# Altium PCB STM32_DevBoard.PcbDoc (part 2 of 2)
Units mm, origin at the board's own origin, x right, y up, seen from the top; angles counter-clockwise.
Board outline 80.64 x 69.55 mm, 2 copper layers (Top Layer, Bottom Layer); 79 components, 67 nets, 279 pads, 244 vias.
Unrouted connection lines stored in the file: 67.
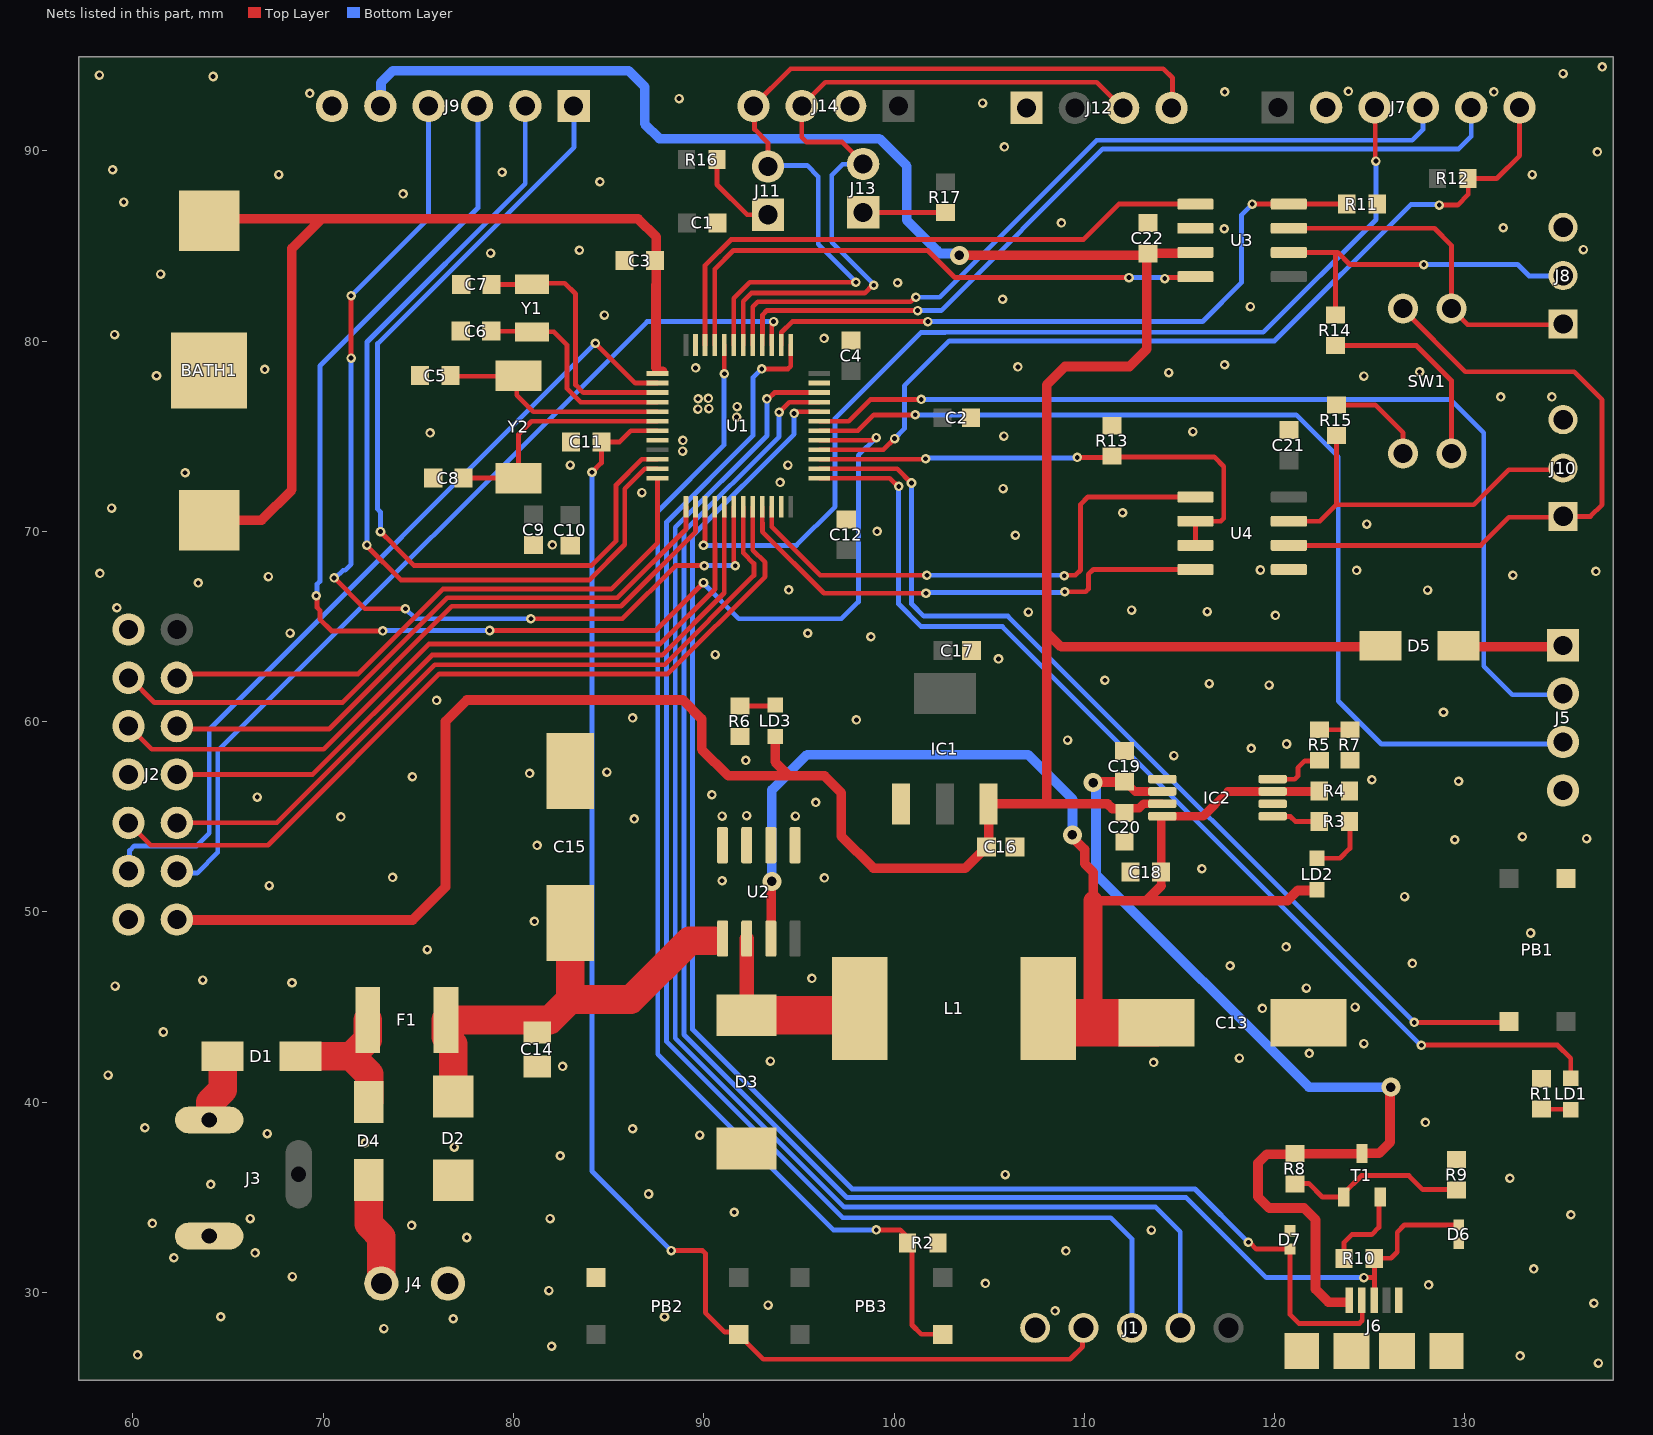
[diagram p2: the nets of this part, all layers, seen from the top]

## Via types
v1: diameter 0.5, hole 0.256, Top Layer to Bottom Layer, tented both sides, 179 vias
v2: diameter 0.5, hole 0.25, Top Layer to Bottom Layer, tented both sides, 51 vias
v3: diameter 1, hole 0.5, Top Layer to Bottom Layer, tented both sides, 14 vias

## Nets (pads, with @x,y where several pads share a name; then routed paths per layer and width w, separated by ;. In a path a pad name is that pad's centre, name@x,y a point inside that pad or via, vN(x,y) a via of type N, cw(c..) or ccw(c..) an arc to the next point about the centre after c; other vN are vias at no path point) (continued)
+5V: C16.2 C20.2 C22.2 D5.1 IC1.3 IC2.OUT J2.13 J9.5 LD3.2 U3.VCC | length 175.2
  Top Layer w0.45: C20.2@112.116,55.208 112.366,55.458 112.887,55.458 113.111,55.682 IC2.OUT@114.092,55.682
  Top Layer w0.508: J2.13@62.306,49.606 62.332,49.581 74.701,49.581 76.429,51.308 76.429,60.02 77.546,61.138 88.9,61.138 89.891,60.147 89.891,58.547 91.288,57.15 94.488,57.15 ; LD3.2@93.751,59.221 93.751,57.887 94.488,57.15 ; v3(103.429,84.506) 113.246,84.506 C22.2@113.335,84.595 ; C20.2@112.116,55.208 111.895,55.429 111.475,55.429 111.221,55.682 108.015,55.682 ; U3.VCC@115.833,84.658 115.168,84.658 115.117,84.607 113.424,84.607 113.284,84.468 113.284,79.578 112.37,78.664 108.98,78.664 108.015,77.699 108.015,64.694 ; D5.1@125.56,63.983 125.509,63.932 108.777,63.932 108.015,64.694 ; 94.488,57.15 96.342,57.15 97.231,56.261 97.231,53.975 98.908,52.299 103.746,52.299 C16.2@104.863,53.416 104.976,53.529 104.976,55.682 108.015,55.682 ; 108.015,55.682 108.015,64.694
  Bottom Layer w0.508: J9.5@73,92.354 73.035,92.389 73.035,93.583 73.66,94.209 86.055,94.209 86.893,93.37 86.893,91.415 87.668,90.64 99.225,90.64 100.673,89.192 100.673,86.347 102.261,84.759 102.42,84.6 103.335,84.6 v3(103.429,84.506)
BOOT0: PB3.1 R2.1 U1.44 | length 62.4
  Top Layer w0.254: U1.44@91.071,79.79 91.071,78.296 v2(91.084,78.283) ; v2(99.06,33.294) 100.325,33.294 100.94,32.68 100.94,28.296 101.424,27.812 PB3.1@102.556,27.812
  Bottom Layer w0.254: v2@91.059,78.283 91.059,74.524 87.579,71.044 87.579,42.52 96.805,33.294 v2(99.06,33.294)
BUCK_5V: C13.1 C18.1 IC2.D1 IC2.IN1 L1.2 LD2.2 R4.2 U2.3 | length 69.2
  Top Layer w0.45: C18.1@114.033,52.502 114.033,55.032 IC2.IN1@114.092,55.032 116.246,55.032 117.546,56.332 IC2.D1@119.892,56.332 122.309,56.332 R4.2@122.339,56.363 ; 114.046,51.384 C18.1@114.046,52.489
  Top Layer w0.508: U2.3@93.523,48.599 93.548,48.624 93.548,51.587 v3(93.574,51.613) ; v3(109.372,54.051) 109.372,53.918 110.012,53.279 110.012,52.547 110.465,52.094 110.465,50.597 113.258,50.597 ; 114.046,51.384 113.258,50.597 ; LD2.2@122.225,51.169 122.186,51.13 121.209,51.13 120.675,50.597 113.258,50.597
  Top Layer w1: 110.465,44.171 110.465,50.597
  Top Layer w2.5: L1.2@108.099,44.933 108.861,44.171 110.465,44.171 C13.1@113.78,44.171
  Bottom Layer w0.508: v3(93.574,51.613) 93.574,56.413 95.428,58.268 107.036,58.268 109.372,55.931 v3(109.372,54.051)
CAN_RX: U1.45 U3.RXD | length 30.3
  Top Layer w0.254: U1.45@90.571,79.79 90.571,83.782 91.549,84.76 101.778,84.76 103.2,83.337 v2(112.344,83.337) ; v2(114.224,83.287) 114.271,83.334 115.778,83.334 U3.RXD@115.833,83.388
  Bottom Layer w0.254: v2(112.344,83.337) v2@114.198,83.337
CAN_S: R11.1 U1.38 U3.S | length 35.3
  Top Layer w0.254: U1.38@94.071,79.79 94.071,80.451 94.646,81.026 v2(101.778,81.026) ; v2(118.821,87.198) U3.S@120.743,87.198 R11.1@123.787,87.198
  Bottom Layer w0.254: v2(101.778,81.026) 116.205,81.026 118.264,83.085 118.264,83.488 118.262,83.49 118.262,86.639 v2(118.821,87.198)
CAN_TX: U1.46 U3.TXD | length 31.3
  Top Layer w0.254: U1.46@90.071,79.79 90.071,83.975 91.429,85.333 109.945,85.333 111.811,87.198 U3.TXD@115.833,87.198
CANH: J8.1 SW1.1A U3.CANH | length 18.5
  Top Layer w0.254: U3.CANH@120.743,85.928 128.397,85.928 129.286,85.039 SW1.1A@129.286,81.712 130.137,80.861 135.115,80.861 J8.1@135.153,80.899
CANL: J8.2 R14.2 U3.CANL | length 18.2
  Top Layer w0.254: U3.CANL@120.743,84.658 123.19,84.658 ; R14.2@123.19,81.369 123.19,84.658 ; v2(127.838,84.023) 123.952,84.023 123.317,84.658 123.19,84.658
  Bottom Layer w0.254: v2(127.838,84.023) 132.766,84.023 133.363,83.426 135.141,83.426 J8.2@135.153,83.439
CS: J7.6 R12.2 U1.28 | length 47.6
  Top Layer w0.254: U1.28@96.071,74.29 99.436,74.29 v2(100.025,74.879) ; v2(128.651,87.147) 129.616,87.147 130.175,87.706 130.175,88.532 R12.2@130.162,88.544 131.674,88.544 132.867,89.738 J7.6@132.867,92.278
  Bottom Layer w0.254: v2(100.025,74.879) 100.54,75.394 100.54,77.655 102.895,80.01 119.99,80.01 127.152,87.173 128.626,87.173 v2(128.651,87.147)
CTRL1: J9.1 U1.10 | length 46.1
  Top Layer w0.254: v2(73.011,69.991) 73.696,69.305 73.696,69.28 74.778,68.199 84.092,68.199 85.391,69.498 85.391,72.437 86.744,73.79 U1.10@87.571,73.79
  Bottom Layer w0.254: v2(73.011,69.991) 73.011,71.014 72.858,71.167 72.858,79.869 83.185,90.195 83.185,92.329 J9.1@83.16,92.354
CTRL2: J9.2 U1.11 | length 46.7
  Top Layer w0.254: v2(72.299,69.28) 72.299,69.229 74.092,67.437 83.972,67.437 85.845,69.31 85.845,72.231 86.904,73.29 U1.11@87.571,73.29
  Bottom Layer w0.254: v2(72.299,69.28) 72.299,79.952 80.62,88.272 J9.2@80.62,92.354
CTRL3: J9.3 U1.29 | length 73.5
  Top Layer w0.254: v2(69.632,66.613) 69.68,66.566 69.68,66 69.825,65.855 69.825,65.38 70.434,64.77 v2(73.127,64.77) ; v2(78.74,64.791) 87.466,64.791 v2(89.984,67.31) ; U1.29@96.071,74.79 98.853,74.79 98.993,74.93 v2(99.06,74.93)
  Bottom Layer w0.254: v2(69.632,66.613) 69.68,66.66 69.68,67.226 69.825,67.371 69.825,78.689 78.13,86.995 78.13,92.304 J9.3@78.08,92.354 ; v2(73.127,64.77) 73.148,64.791 v2(78.74,64.791) ; v2(89.984,67.31) 89.984,67.267 91.846,65.405 97.231,65.405 98.122,66.296 98.122,73.992 v2(99.06,74.93)
CTRL4: J9.4 U1.18 | length 53.2
  Top Layer w0.254: v2(70.572,67.553) 72.187,65.938 v2(74.32,65.938) ; v2(71.463,79.108) v2(71.463,82.385) ; v2(80.914,65.405) 85.725,65.405 88.519,68.199 v2(90.018,68.199) ; U1.18@91.571,71.29 91.571,68.45 91.601,68.42 91.601,68.246 v2(91.648,68.199)
  Bottom Layer w0.254: v2(70.572,67.553) 70.639,67.553 71.045,67.959 71.153,67.959 71.463,68.27 71.463,79.032 v2@71.425,79.07 ; v2(71.463,82.385) 75.54,86.462 J9.4@75.54,92.354 ; v2(74.32,65.938) 74.854,65.405 v2(80.914,65.405) ; v2(90.018,68.199) v2(91.648,68.199)
GND: BATH1.2 C1.2 C2.1 C3.1 C4.2 C5.1 C6.1 C7.1 C8.1 C9.1 C10.1 C11.2 C12.2 C13.2 C14.1 C15.2 C16.1 C17.1 C18.2 C19.1 C20.1 C21.2 C22.1 D2.2 D3.2 D6.1 D7.1 IC1.1 IC2.D0 IC2.GND J1.5 J2.2 J2.8 J2.14 J3.2 J4.2 J5.4 J6.5 J6.S3 J6.S4 J6.S5 J6.S6 J7.2 J8.3 J9.6 J10.3 J12.1 J14.2 PB1.4 PB2.4 R1.1 R2.2 R4.1 R6.1 R7.1 R9.1 R11.2 R13.1 U1.8 U1.23 U1.35 U1.47 U2.5 U2.6 U2.7 U2.8 U3.GND U4.GND | length 0.1
  Top Layer w0.254: C11.2@82.982,74.663 C11.2@83.02,74.701
  other v1: 137.008,26.289 132.893,26.67 60.249,26.721 82.002,27.178 73.187,28.101 76.835,28.626 64.618,28.727 87.935,28.727 108.458,29.032 93.379,29.342 136.779,29.439 81.864,30.099 128.092,30.404 104.8,30.482 68.377,30.836 133.612,31.247 62.154,31.826 66.421,32.08 109.025,32.186 77.546,32.893 113.521,33.279 74.64,33.525 61.025,33.633 66.167,33.884 81.923,33.888 135.568,34.091 91.601,34.218 87.097,35.179 64.089,35.681 132.358,36.006 105.842,36.195 82.457,37.19 76.886,37.643 72.212,37.871 89.789,38.278 67.062,38.351 86.258,38.608 60.63,38.659 127.923,38.943 58.699,41.427 82.575,41.885 113.638,42.099 93.497,42.164 118.144,42.321 121.818,42.57 124.689,43.078 61.603,43.693 119.355,44.933 124.225,45 121.666,45.999 59.063,46.106 68.36,46.283 63.669,46.422 95.682,46.507 117.661,47.172 127.242,47.297 75.464,48.02 120.598,48.161 133.452,48.895 81.102,49.505 126.831,50.805 67.166,51.389 90.957,51.638 96.342,51.791 73.643,51.821 116.18,52.273 81.238,53.497 129.464,53.797 136.39,53.856 133.02,53.95 86.343,54.894 70.925,54.996 90.957,55.042 94.818,55.042 92.253,55.067 95.885,55.753 66.531,56.037 90.424,56.159 129.667,56.871 125.106,56.947 74.684,57.104 80.848,57.277 84.912,57.353 92.202,57.963 114.706,58.217 118.77,58.598 120.625,58.826 109.118,59.03 98.019,60.096 86.258,60.198 128.871,60.498 75.954,61.117 119.71,61.925 116.561,62.001 111.074,62.179 105.486,63.297 90.602,63.525 98.781,64.465 95.462,64.648 68.263,64.659 120.04,65.583 107.061,65.761 116.459,65.786 112.48,65.867 59.157,65.989 128.034,66.913 94.463,66.929 63.432,67.289 67.115,67.619 132.52,67.696 58.268,67.793 136.881,67.894 124.307,67.945 119.253,67.97 82.042,69.291 106.375,69.799 99.111,70.002 124.841,70.383 112.01,70.977 58.877,71.222 86.749,72.039 105.733,72.248 94.014,72.572 62.746,73.08 82.982,73.482 94.419,73.485 88.883,74.223 88.9,74.778 105.774,75.011 75.613,75.173 115.705,75.239 91.728,76.001 89.687,76.429 90.272,76.454 91.753,76.56 89.696,76.967 90.246,76.987 131.88,77.07 134.569,77.064 124.689,78.156 61.239,78.181 114.436,78.348 127.618,78.389 66.929,78.511 89.569,78.592 106.511,78.643 117.363,78.756 96.325,80.142 59.038,80.345 84.773,81.364 118.72,81.813 105.698,82.199 100.186,83.063 61.451,83.52 78.8,84.62 83.467,84.771 136.22,84.811 117.348,85.903 132.012,85.958 108.788,86.208 59.521,87.304 74.202,87.736 84.54,88.371 67.666,88.748 133.536,88.752 79.4,88.875 58.928,89.002 136.957,89.941 105.799,90.2 104.648,92.507 88.705,92.74 69.291,93.015 117.373,93.091 131.521,93.091 123.876,93.116 64.211,93.904 58.242,93.98 135.153,94.056 137.211,94.412
I2C_SCL: J12.3 J13.2 J14.3 U1.42 | length 41.5
  Top Layer w0.254: U1.42@92.071,79.79 92.071,82.089 92.5,82.518 98.454,82.518 98.866,82.931 v2(98.933,82.931) ; J13.2@98.374,89.306 98.374,89.351 97.265,90.46 95.402,90.46 95.148,90.714 J14.3@95.148,92.354 96.393,93.599 110.642,93.599 111.989,92.253 J12.3@112.039,92.253
  Bottom Layer w0.254: J13.2@98.374,89.306 98.359,89.291 97.292,89.291 96.723,88.722 96.723,85.199 98.933,82.989 v2(98.933,82.931)
I2C_SDA: J11.2 J12.4 J14.4 U1.43 | length 46.6
  Top Layer w0.254: U1.43@91.571,79.79 91.571,82.249 92.417,83.095 v2(97.993,83.095) ; J11.2@93.37,89.179 93.37,90.424 92.671,91.123 92.671,92.292 J14.4@92.608,92.354 94.564,94.31 114.148,94.31 114.63,93.828 114.63,92.304 J12.4@114.579,92.253
  Bottom Layer w0.254: J11.2@93.37,89.179 93.421,89.23 95.428,89.23 96.012,88.646 96.012,85.088 97.993,83.107 v2(97.993,83.095)
MISO: J7.5 U1.40 | length 44.2
  Top Layer w0.254: U1.40@93.071,79.79 93.071,80.334 93.087,80.35 93.087,81.378 93.32,81.61 101.226,81.61 v2(101.233,81.603)
  Bottom Layer w0.254: v2(101.233,81.603) 102.481,81.603 110.975,90.097 129.67,90.097 130.327,90.754 J7.5@130.327,92.278
MOSI: J7.4 U1.41 | length 42.3
  Top Layer w0.254: U1.41@92.571,79.79 92.571,81.801 92.834,82.064 100.874,82.064 101.116,82.306 v2(101.146,82.306)
  Bottom Layer w0.254: v2(101.146,82.306) 102.399,82.306 110.644,90.551 127.229,90.551 127.787,91.11 J7.4@127.787,92.278
NetC5_2: C5.2 U1.5 Y2.2 | length 12.4
  Top Layer w0.254: C5.2@76.695,78.181 76.721,78.155 80.231,78.155 Y2.2@80.264,78.189 80.171,78.096 80.171,77.157 81.038,76.29 U1.5@87.571,76.29
NetC8_2: C8.2 U1.6 Y2.1 | length 12.8
  Top Layer w0.254: C8.2@77.381,72.796 80.256,72.796 Y2.1@80.264,72.789 80.264,75.108 80.946,75.79 U1.6@87.571,75.79
NetD1_2: D1.2 J3.1 | length 3.4
  Top Layer w1.5: J3.1@64.058,39.294 64.058,40.004 64.719,40.665 64.719,42.4 D1.2@64.701,42.418
NetD3_1: D3.1 L1.1 U2.2 | length 10.1
  Top Layer w0.75: D3.1@92.253,44.572 U2.2@92.253,48.599 ; L1.1@97.839,44.572 L1.1@98.199,44.933
  Top Layer w2: D3.1@92.253,44.572 L1.1@97.839,44.572
NetD4_2: D4.2 J4.1 | length 5.7
  Top Layer w1.5: D4.2@72.39,35.923 72.39,33.604 73.053,32.941 J4.1@73.053,30.48
NetD5_2: D5.2 J5.1 | length 5.5
  Top Layer w0.254: J5.1@135.077,63.932 J5.1@135.153,64.008
  Top Layer w0.508: D5.2@129.66,63.983 129.71,63.932 J5.1@135.077,63.932
NetJ11_1: J11.1 R16.2 | length 4.6
  Top Layer w0.254: R16.2@90.691,89.535 90.691,88.227 92.278,86.639 J11.1@93.37,86.639
NetJ13_1: J13.1 R17.2 | length 4.3
  Top Layer w0.254: J13.1@98.374,86.766 98.387,86.754 R17.2@102.692,86.754
NetLD1_1: LD1.1 R1.2 | length 1.6
  Top Layer w0.254: R1.2@134.01,39.637 135.535,39.637 LD1.1@135.56,39.612
NetLD2_1: LD2.1 R3.1 | length 3.4
  Top Layer w0.254: LD2.1@122.225,52.819 123.431,52.819 123.952,53.34 R3.1@123.952,54.75
  Top Layer w0.508: R3.1@123.939,54.762 R3.1@123.952,54.75
NetLD3_1: LD3.1 R6.2 | length 1.9
  Top Layer w0.254: R6.2@91.897,60.82 93.701,60.82 LD3.1@93.751,60.871
NetR3_2: IC2.STAT R3.2 | length 2.6
  Top Layer w0.254: IC2.STAT@119.892,55.032 119.908,55.016 120.828,55.016 121.082,54.762 R3.2@122.339,54.762
NetR5_1: R5.1 R7.2 | length 1.6
  Top Layer w0.254: R5.1@122.352,59.576 R7.2@123.952,59.576
NetR5_2: IC2.ILIM R5.2 | length 3.1
  Top Layer w0.254: IC2.ILIM@119.892,56.982 119.902,56.972 121.056,56.972 121.221,57.137 121.221,57.569 121.59,57.937 122.314,57.937 R5.2@122.352,57.976
NetR8_1: R8.1 R9.2 T1.1 | length 9.7
  Top Layer w0.254: R8.1@121.056,35.7 121.094,35.738 121.793,35.738 122.511,35.02 T1.1@123.637,35.02 123.637,35.22 124.562,36.144 127.051,36.144 127.787,35.408 129.553,35.408 R9.2@129.565,35.395
NetR10_1: R10.1 T1.2 | length 4.6
  Top Layer w0.254: R10.1@123.635,31.801 123.635,32.626 124.054,33.045 125.095,33.045 125.476,33.426 125.476,34.959 T1.2@125.537,35.02
NetR14_1: R14.1 SW1.1B | length 10.7
  Top Layer w0.254: R14.1@123.19,79.769 127.444,79.769 129.286,77.927 SW1.1B@129.286,74.092
NetR15_1: R15.1 SW1.2B | length 5.2
  Top Layer w0.254: R15.1@123.241,76.644 125.286,76.644 126.746,75.184 SW1.2B@126.746,74.092
NRST: C11.1 J1.4 PB2.1 U1.7 | length 74.7
  Top Layer w0.254: v2(84.125,73.101) 84.62,73.596 C11.1@84.62,74.701 85.573,74.701 86.161,75.29 U1.7@87.571,75.29 ; v2(88.29,32.207) 89.932,32.207 90.081,32.058 90.081,28.943 91.105,27.919 91.704,27.919 93.131,26.492 109.245,26.492 109.906,27.153 109.906,28.092 J1.4@109.957,28.143
  Bottom Layer w0.254: v2(84.125,73.101) 84.125,36.373 v2(88.29,32.207)
PA2: J2.3 U1.12 | length 31.6
  Top Layer w0.254: J2.3@62.306,62.306 62.509,62.509 71.831,62.509 76.292,66.97 85.131,66.97 87.571,69.41 U1.12@87.571,72.79
PA3: J2.4 U1.13 | length 34.8
  Top Layer w0.254: J2.4@59.766,62.306 59.829,62.306 61.132,61.003 71.01,61.003 76.524,66.516 85.462,66.516 89.071,70.125 U1.13@89.071,71.29
PA4: J2.5 U1.14 | length 32.9
  Top Layer w0.254: J2.5@62.306,59.766 62.459,59.614 70.307,59.614 76.756,66.062 85.65,66.062 89.571,69.983 U1.14@89.571,71.29
PA6: J2.6 U1.16 | length 39.2
  Top Layer w0.254: J2.6@59.766,59.766 60.985,58.547 70.028,58.547 75.565,64.084 87.706,64.084 90.595,66.973 90.595,69.391 90.571,69.414 U1.16@90.571,71.29
PA7: J2.7 U1.17 | length 37.2
  Top Layer w0.254: J2.7@62.306,57.226 69.444,57.226 75.717,63.5 87.808,63.5 91.071,66.763 U1.17@91.071,71.29
PB1: J2.9 U1.19 | length 39.6
  Top Layer w0.254: J2.9@62.306,54.686 67.564,54.686 75.87,62.992 87.942,62.992 92.634,67.684 92.634,68.309 92.071,68.871 U1.19@92.071,71.29
PB2: J2.10 U1.20 | length 43.7
  Top Layer w0.254: J2.10@59.766,54.686 60.943,53.509 67.098,53.509 76.098,62.509 88.101,62.509 93.218,67.626 93.218,68.366 92.571,69.013 U1.20@92.571,71.29
PB3: J2.11 U1.39 | length 47.8
  Top Layer w0.254: U1.39@93.571,79.79 93.571,80.866 93.664,80.959 v2(93.664,81.026)
  Bottom Layer w0.254: J2.11@62.306,52.146 62.408,52.045 63.373,52.045 64.462,53.134 64.462,58.468 87.02,81.026 v2(93.664,81.026)
PC13: J2.12 U1.2 | length 44
  Top Layer w0.254: v2(84.303,79.883) 86.396,77.79 U1.2@87.571,77.79
  Bottom Layer w0.254: J2.12@59.766,52.146 59.824,52.204 59.824,53.228 60.071,53.475 63.348,53.475 64.008,54.136 64.008,59.588 v2(84.303,79.883)
RS485_A: J10.1 SW1.2A U4.A | length 35.3
  Top Layer w0.254: U4.A@120.743,69.266 130.835,69.266 132.309,70.739 135.103,70.739 J10.1@135.153,70.79 136.593,70.79 137.203,71.399 137.203,76.919 135.738,78.384 130.023,78.384 126.746,81.661 SW1.2A@126.746,81.712
RS485_B: J10.2 R15.2 U4.B | length 19.2
  Top Layer w0.254: U4.B@120.743,70.536 122.377,70.536 123.241,71.399 ; R15.2@123.241,75.044 123.241,71.399 ; J10.2@135.153,73.33 135.064,73.241 132.296,73.241 130.454,71.399 123.241,71.399
RS485_DE: R13.2 U1.27 U4.!RE U4.DE | length 27.1
  Top Layer w0.254: U1.27@96.071,73.79 101.628,73.79 v2(101.651,73.812) ; v2(109.626,73.889) 111.392,73.889 R13.2@111.455,73.952 111.493,73.914 116.815,73.914 117.319,73.41 117.319,70.685 117.17,70.536 U4.!RE@115.833,70.536 U4.DE@115.833,69.266
  Bottom Layer w0.254: v2(101.651,73.812) 101.689,73.85 109.588,73.85 v2(109.626,73.889)
RS485_UART_RX: U1.22 U4.R | length 28.1
  Top Layer w0.254: U1.22@93.571,71.29 93.571,70.234 96.114,67.691 v2(101.727,67.691) ; v2(108.942,67.667) 108.966,67.691 109.525,67.691 109.804,67.97 109.804,71.425 110.185,71.806 U4.R@115.833,71.806
  Bottom Layer w0.254: v2(101.727,67.691) v2@108.935,67.691
RS485_UART_TX: U1.21 U4.D | length 26.4
  Top Layer w0.254: U1.21@93.071,71.29 93.071,70.446 93.077,70.44 93.077,69.991 96.317,66.751 v2(101.676,66.751) ; v2(108.966,66.827) 110.062,66.827 110.211,66.976 110.211,67.742 110.465,67.996 U4.D@115.833,67.996
  Bottom Layer w0.254: v2(101.676,66.751) 101.714,66.789 108.928,66.789 v2(108.966,66.827)
RTC_IN: C7.2 U1.3 Y1.1 | length 13.9
  Top Layer w0.254: C7.2@78.854,82.982 80.97,82.982 81.026,83.038 82.697,83.038 83.259,82.476 83.259,77.7 83.67,77.29 U1.3@87.571,77.29
RTC_OUT: C6.2 U1.4 Y1.2 | length 11.6
  Top Layer w0.254: C6.2@78.829,80.518 80.944,80.518 Y1.2@80.975,80.487 82.124,80.487 82.805,79.805 82.805,77.512 83.528,76.79 U1.4@87.571,76.79
SCK: J7.3 U1.15 | length 53.1
  Top Layer w0.254: v2(89.984,69.266) 90.031,69.313 90.031,69.487 90.071,69.526 U1.15@90.071,71.29 ; J7.3@125.247,92.278 125.285,92.24 125.285,89.497 v2(125.324,89.459)
  Bottom Layer w0.254: v2(89.984,69.266) 94.869,69.266 96.901,71.298 96.901,75.946 101.404,80.449 102.692,80.449 102.707,80.464 119.402,80.464 125.324,86.385 v2(125.324,89.459)
SWCLK: J1.3 U1.37 | length 73.5
  Top Layer w0.254: v2(93.04,78.537) 94.422,78.537 94.571,78.686 U1.37@94.571,79.79
  Bottom Layer w0.254: v2(93.04,78.537) 92.583,78.08 92.583,75.032 88.045,70.494 88.045,43.184 97.295,33.934 111.379,33.934 112.497,32.817 J1.3@112.497,28.143
SWDIO: J1.2 U1.34 | length 74.3
  Top Layer w0.254: v2(93.32,76.962) 93.386,76.962 93.714,77.29 U1.34@96.071,77.29
  Bottom Layer w0.254: v2(93.32,76.962) 93.32,75.032 88.499,70.211 88.499,43.372 97.378,34.493 113.741,34.493 115.037,33.198 J1.2@115.037,28.143
UART_RX: J5.2 U1.31 | length 53.2
  Top Layer w0.254: U1.31@96.071,75.79 97.618,75.79 98.765,76.937 v2(101.422,76.937)
  Bottom Layer w0.254: v2(101.422,76.937) 129.235,76.937 130.988,75.184 130.988,62.916 132.486,61.417 135.103,61.417 J5.2@135.153,61.468
UART_TX: J5.3 U1.30 | length 54.1
  Top Layer w0.254: U1.30@96.071,75.29 98.095,75.29 98.93,76.124 v2(101.117,76.124)
  Bottom Layer w0.254: v2(101.117,76.124) 121.133,76.124 123.342,73.914 123.342,61.087 125.603,58.826 135.052,58.826 J5.3@135.153,58.928
USB_5V: C19.2 IC2.IN2 J6.1 R8.2 T1.3 | length 50
  Top Layer w0.45: C19.2@112.141,56.858 112.667,56.332 IC2.IN2@114.092,56.332
  Top Layer w0.508: v3(110.465,56.794) 110.496,56.826 112.084,56.826 C19.2@112.116,56.858 ; J6.1@123.749,29.497 122.826,29.497 122.149,30.175 122.149,33.833 121.539,34.442 119.71,34.442 119.126,35.027 119.126,36.805 119.596,37.274 121.031,37.274 R8.2@121.056,37.3 124.567,37.3 T1.3@124.587,37.32 125.483,37.32 126.06,37.897 126.06,40.742 v3(126.111,40.792)
  Bottom Layer w0.508: v3(110.465,56.794) 110.61,56.649 110.61,51.975 121.793,40.792 v3(126.111,40.792)
USB_D+: D6.2 J6.3 R10.2 U1.33 | length 86.9
  Top Layer w0.254: v2(93.955,76.254) 94.49,76.79 U1.33@96.071,76.79 ; v2(124.689,30.785) 125.248,30.785 ; J6.3@125.248,29.362 125.248,30.785 ; D6.2@129.693,33.528 D6.2@129.668,33.553 126.822,33.553 126.441,33.172 126.441,32.131 126.111,31.801 R10.2@125.235,31.801 125.248,31.788 125.248,30.785
  Bottom Layer w0.254: v2(93.955,76.254) 93.955,74.981 88.953,69.98 88.953,43.56 97.524,34.989 115.353,34.989 119.558,30.785 v2(124.689,30.785)
USB_D-: D7.2 J6.2 U1.32 | length 80.4
  Top Layer w0.254: v2(94.742,76.2) 94.809,76.2 94.898,76.29 U1.32@96.071,76.29 ; v2(118.618,32.639) 118.685,32.639 119.04,32.283 D7.2@120.802,32.283 120.802,28.854 121.274,28.383 124.449,28.383 124.598,28.531 J6.2@124.598,29.362
  Bottom Layer w0.254: v2(94.742,76.2) 94.742,75.111 89.407,69.776 89.407,43.826 97.79,35.443 115.814,35.443 v2(118.618,32.639)
USER_BTN: PB1.1 U1.26 | length 52
  Top Layer w0.254: U1.26@96.071,73.29 100.156,73.29 100.903,72.542 v2(100.914,72.542) ; v2(127.33,44.196) 132.247,44.196 PB1.1@132.307,44.256
  Bottom Layer w0.254: v2(100.914,72.542) 100.914,66.192 101.558,65.548 105.978,65.548 v2(127.33,44.196)
USER_LED: LD1.2 U1.25 | length 56.8
  Top Layer w0.254: U1.25@96.071,72.79 99.775,72.79 100.204,72.36 v2(100.238,72.36) ; v2(127.711,43.002) 134.862,43.002 135.56,42.305 LD1.2@135.56,41.262
  Bottom Layer w0.254: v2(100.238,72.36) 100.238,66.183 101.422,64.999 105.689,64.999 v2@127.686,43.002
VBAT: BATH1.1 C3.2 U1.1 | length 51.1
  Top Layer w0.508: BATH1.1@64.008,70.588 66.753,70.588 68.351,72.187 68.351,84.861 69.913,86.423 ; BATH1.1@64.008,86.333 64.098,86.423 69.913,86.423 ; U1.1@87.833,78.41 87.681,78.41 87.49,78.6 87.49,82.956 87.503,82.969 87.503,85.471 86.55,86.423 69.913,86.423
Vin_Ext: D1.1 D4.1 F1.1 | length 7.7
  Top Layer w1.5: D1.1@68.801,42.418 71.468,42.418 ; F1.1@72.347,44.323 72.347,43.297 71.468,42.418 ; D4.1@72.39,40.023 72.415,40.048 72.415,41.427 72.415,41.471 71.468,42.418
Vin_Protected: C14.2 C15.1 D2.1 F1.2 U2.1 | length 24
  Top Layer w1.5: D2.1@76.835,40.3 76.835,43.06 76.447,43.448 F1.2@76.447,44.323 81.904,44.323 82.982,45.401 ; C15.1@82.982,49.416 82.982,45.401 ; 90.518,48.489 89.256,48.489 86.168,45.401 82.982,45.401
pads on no net: J3.3 J6.4 PB1.2 PB1.3 PB2.2 PB2.3 PB3.3 PB3.4 U2.4 U3.NC

## Polygon pours and split planes (outlines as drawn)
GND on Top Layer "top gnd" (solid, pour order 0): 57.15,94.945 137.795,94.945 137.795,25.4 57.15,25.4
GND on Bottom Layer "bottom gnd" (solid, pour order 1): 57.15,94.945 137.795,94.945 137.795,25.4 57.15,25.4

## Silkscreen, mask and mechanical layers (free items; w line width, h text height)
Top Overlay:
  text "GND" at 71.527,94.945 h0.85 r180
  text "5V" at 74.041,94.945 h0.85 r180
  text "CTRL4" at 76.683,94.945 h0.85 r180
  text "CTRL3" at 79.325,94.945 h0.85 r180
  text "CTRL2" at 81.967,94.945 h0.85 r180
  text "CTRL1" at 84.633,94.945 h0.85 r180
  text "SDA" at 93.738,94.945 h1 r180
  text "SCL" at 96.303,94.945 h1 r180
  text "GND" at 98.843,94.945 h1 r180
  text "3V3" at 101.358,94.945 h1 r180
  text "OLED" at 116.205,94.945 h1 r180
  text "3V3" at 121.22,94.945 h1 r180
  text "GND" at 123.786,94.945 h1 r180
  text "SCK" at 126.351,94.945 h1 r180
  text "MOSI" at 128.917,94.945 h1 r180
  text "MISO" at 131.457,94.945 h1 r180
  text "CS" at 133.971,94.945 h1 r180
  text "MOTOR CTRL" at 84.772,91.078 h1 r180
  text "I2C" at 91.046,91.067 h1 r90
  text "SPI" at 134.417,91.027 h1 r180
  text "GND" at 137.795,85.199 h1 r90
  text "CANL" at 137.795,82.352 h1 r90
  text "CAN" at 133.871,79.781 h1 r90
  text "CANH" at 137.795,79.544 h1 r90
  text "GND" at 137.795,74.741 h1 r90
  text "B" at 137.795,72.175 h1 r90
  text "RS485 TERM" at 127.723,69.704 h1 r90
  text "CAN TERM" at 130.215,69.694 h1 r90
  text "A" at 137.795,69.61 h1 r90
  text "RS485" at 133.871,69.545 h1 r90
  text "3V3" at 63.589,66.168 h1 r270
  text "GND" at 57.15,66.016 h1 r270
  text "PA2" at 63.589,63.603 h1 r270
  text "PA3" at 57.15,63.45 h1 r270
  text "5V" at 137.795,62.879 h1 r90
  text "5V" at 90.836,62.134 h1.52 r0.39
  text "PA4" at 63.589,61.063 h1 r270
  text "PA6" at 57.15,60.91 h1 r270
  text "RX" at 137.795,60.313 h1 r90
  text "PA7" at 63.589,58.523 h1 r270
  text "GND" at 57.15,58.396 h1 r270
  text "TX" at 137.795,57.773 h1 r90
  text "PB1" at 63.589,55.983 h1 r270
  text "PB2" at 57.15,55.83 h1 r270
  text "GND" at 137.795,55.259 h1 r90
  text "UART" at 133.871,54.813 h1 r90
  text "PB3" at 63.589,53.501 h1 r270
  text "PC13" at 57.15,53.348 h1 r270
  text "5V" at 63.589,50.776 h1 r270
  text "GND" at 57.15,50.623 h1 r270
  text "12V" at 124.47,50.142 h1.52 r90.39
  text "USER BUTTON" at 137.795,44.374 h1 r90
  text "USER LED" at 137.795,37.804 h1 r90
  text "SWD DEBUG" at 105.943,29.582 h1.52
  text "9 - 24V" at 80.375,26.899 h1.52 r90
  text "USB" at 131.661,25.425 h1 r90
  text "POWER IN  9-12V" at 59.461,25.4 h1.52 r90
  text "VCC" at 71.269,25.4 h1.52
  text "GND" at 75.155,25.4 h1.52
  text "RESET" at 85.704,25.4 h1.52
  text "BOOT0" at 96.46,25.4 h1.52
  text "GND" at 106.311,25.4 h1
  text "NRST" at 108.653,25.4 h1
  text "CLK" at 111.533,25.4 h1
  text "DIO" at 114.161,25.4 h1
  text "3V3" at 116.625,25.4 h1
Top Solder:
  text "30.10.2026" at 67.107,93.096 h1.78 r180
  text "DERYA" at 66.7,91.465 h2.29 r180

## Text inside footprints (layer, text, board x,y; h text height)
J4: Top Overlay "2" at 76.253,32.855 h1; Top Overlay "1" at 72.853,32.855 h1